# Altium PCB LCM.PcbDoc
Units mm, origin at the board's own origin, x right, y up, seen from the top; angles counter-clockwise.
Board outline 100 x 100 mm, 4 copper layers (1 - TOP, 2 - GND, 3- PWR, 4 - BOT), stack 1.587 mm thick; 134 components, 87 nets, 393 pads, 0 vias.
Unrouted connection lines stored in the file: 250.
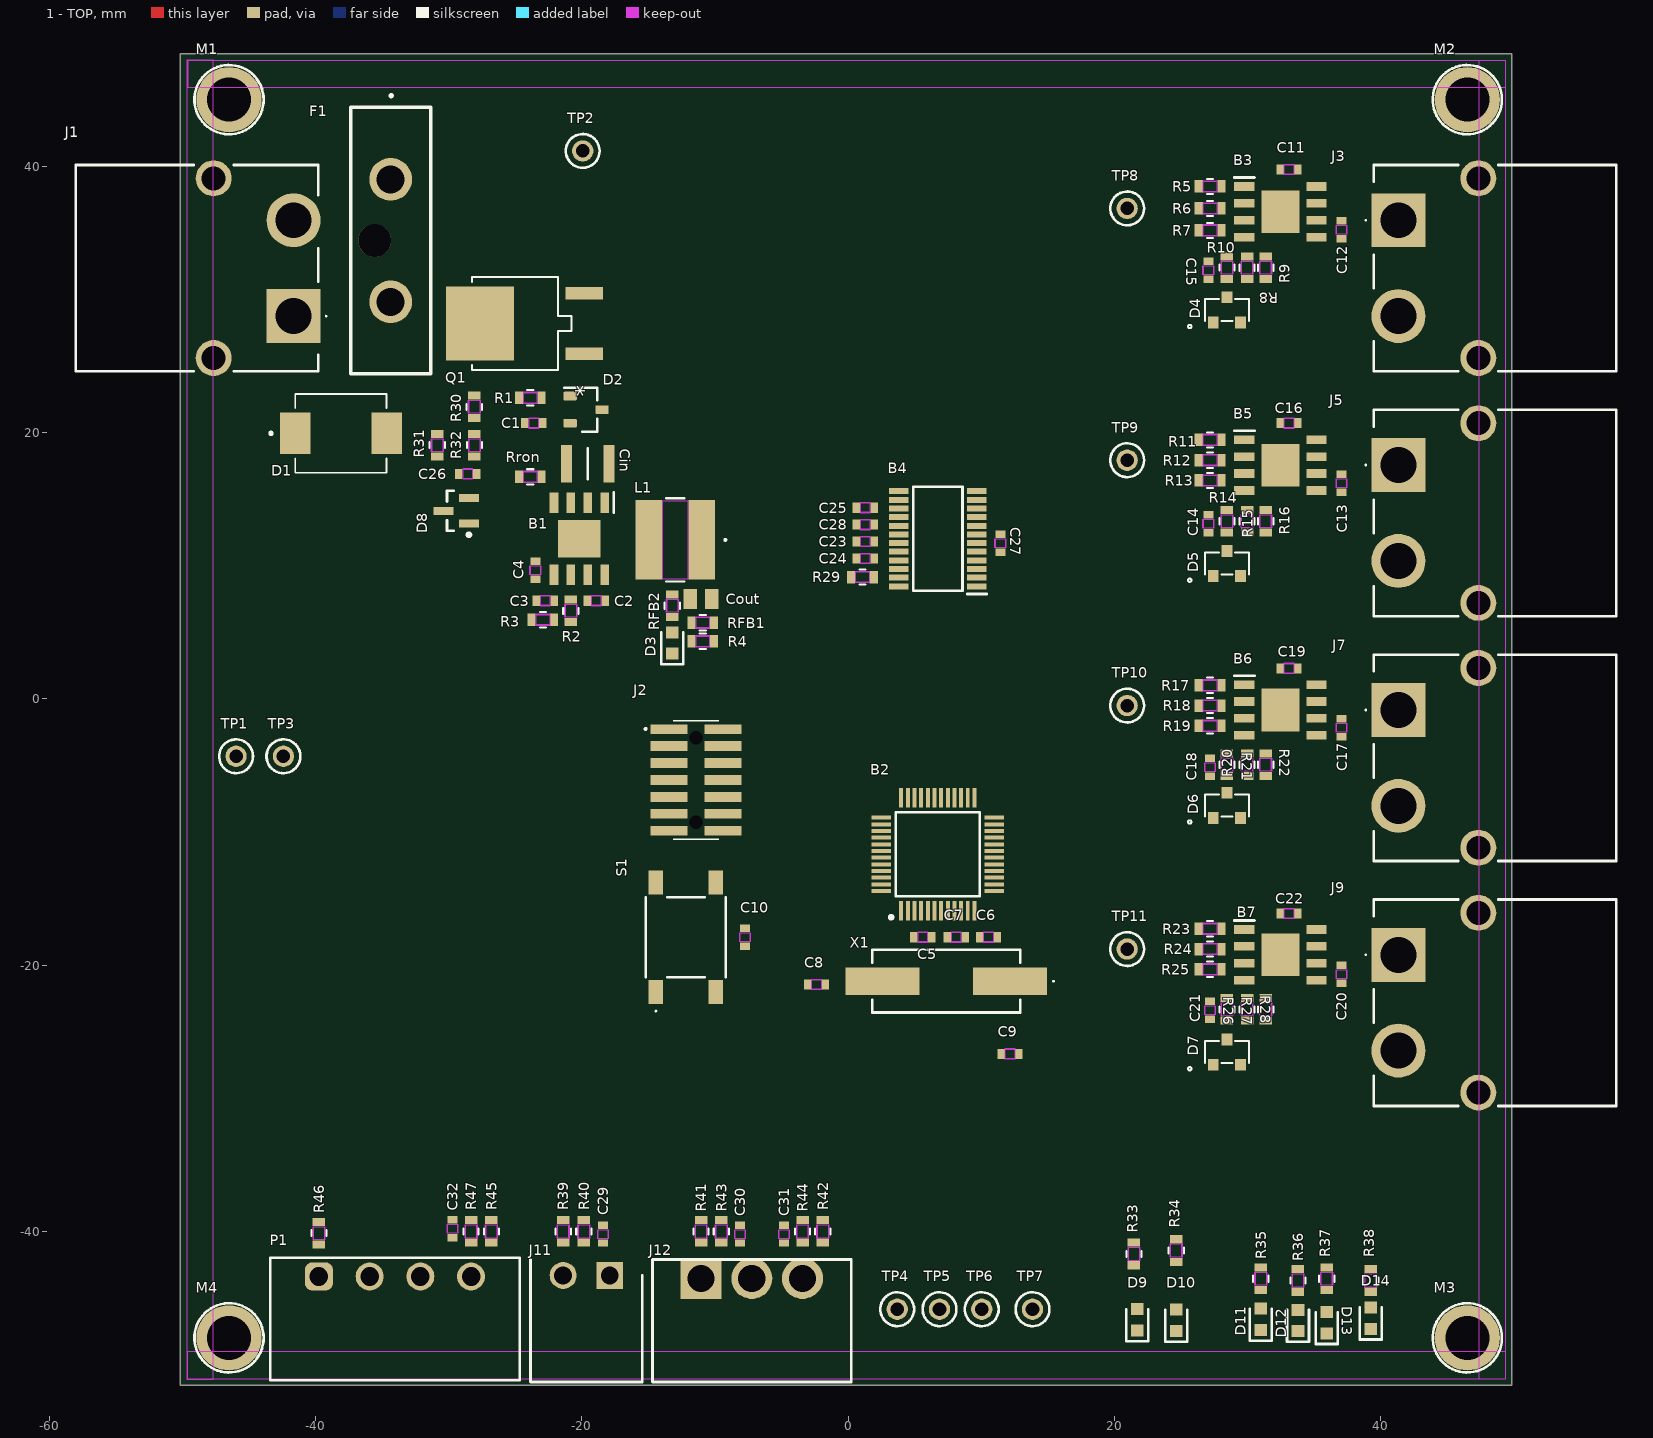
[diagram p0: 1 - TOP view]
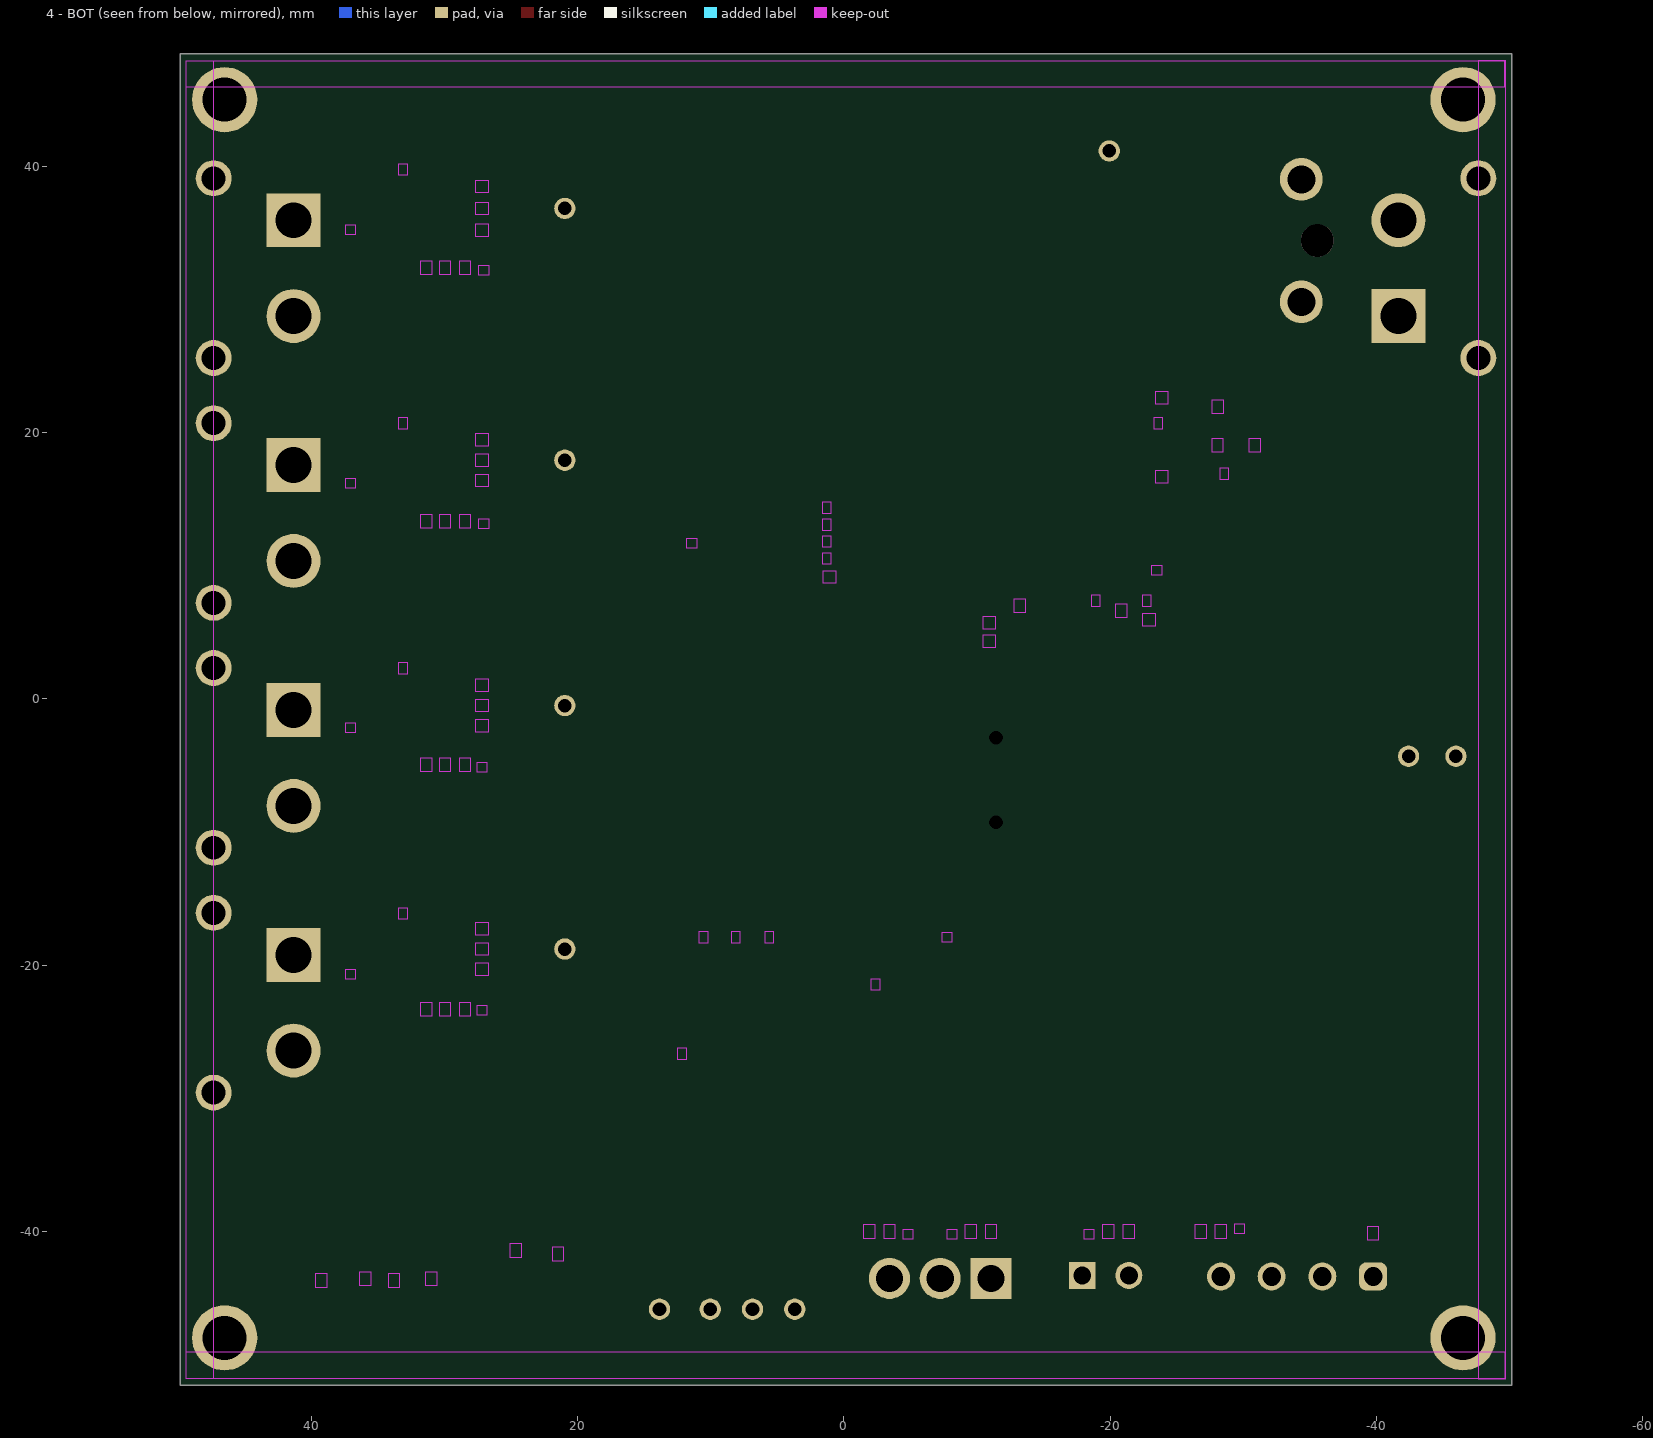
[diagram p1: 4 - BOT view, seen from below]
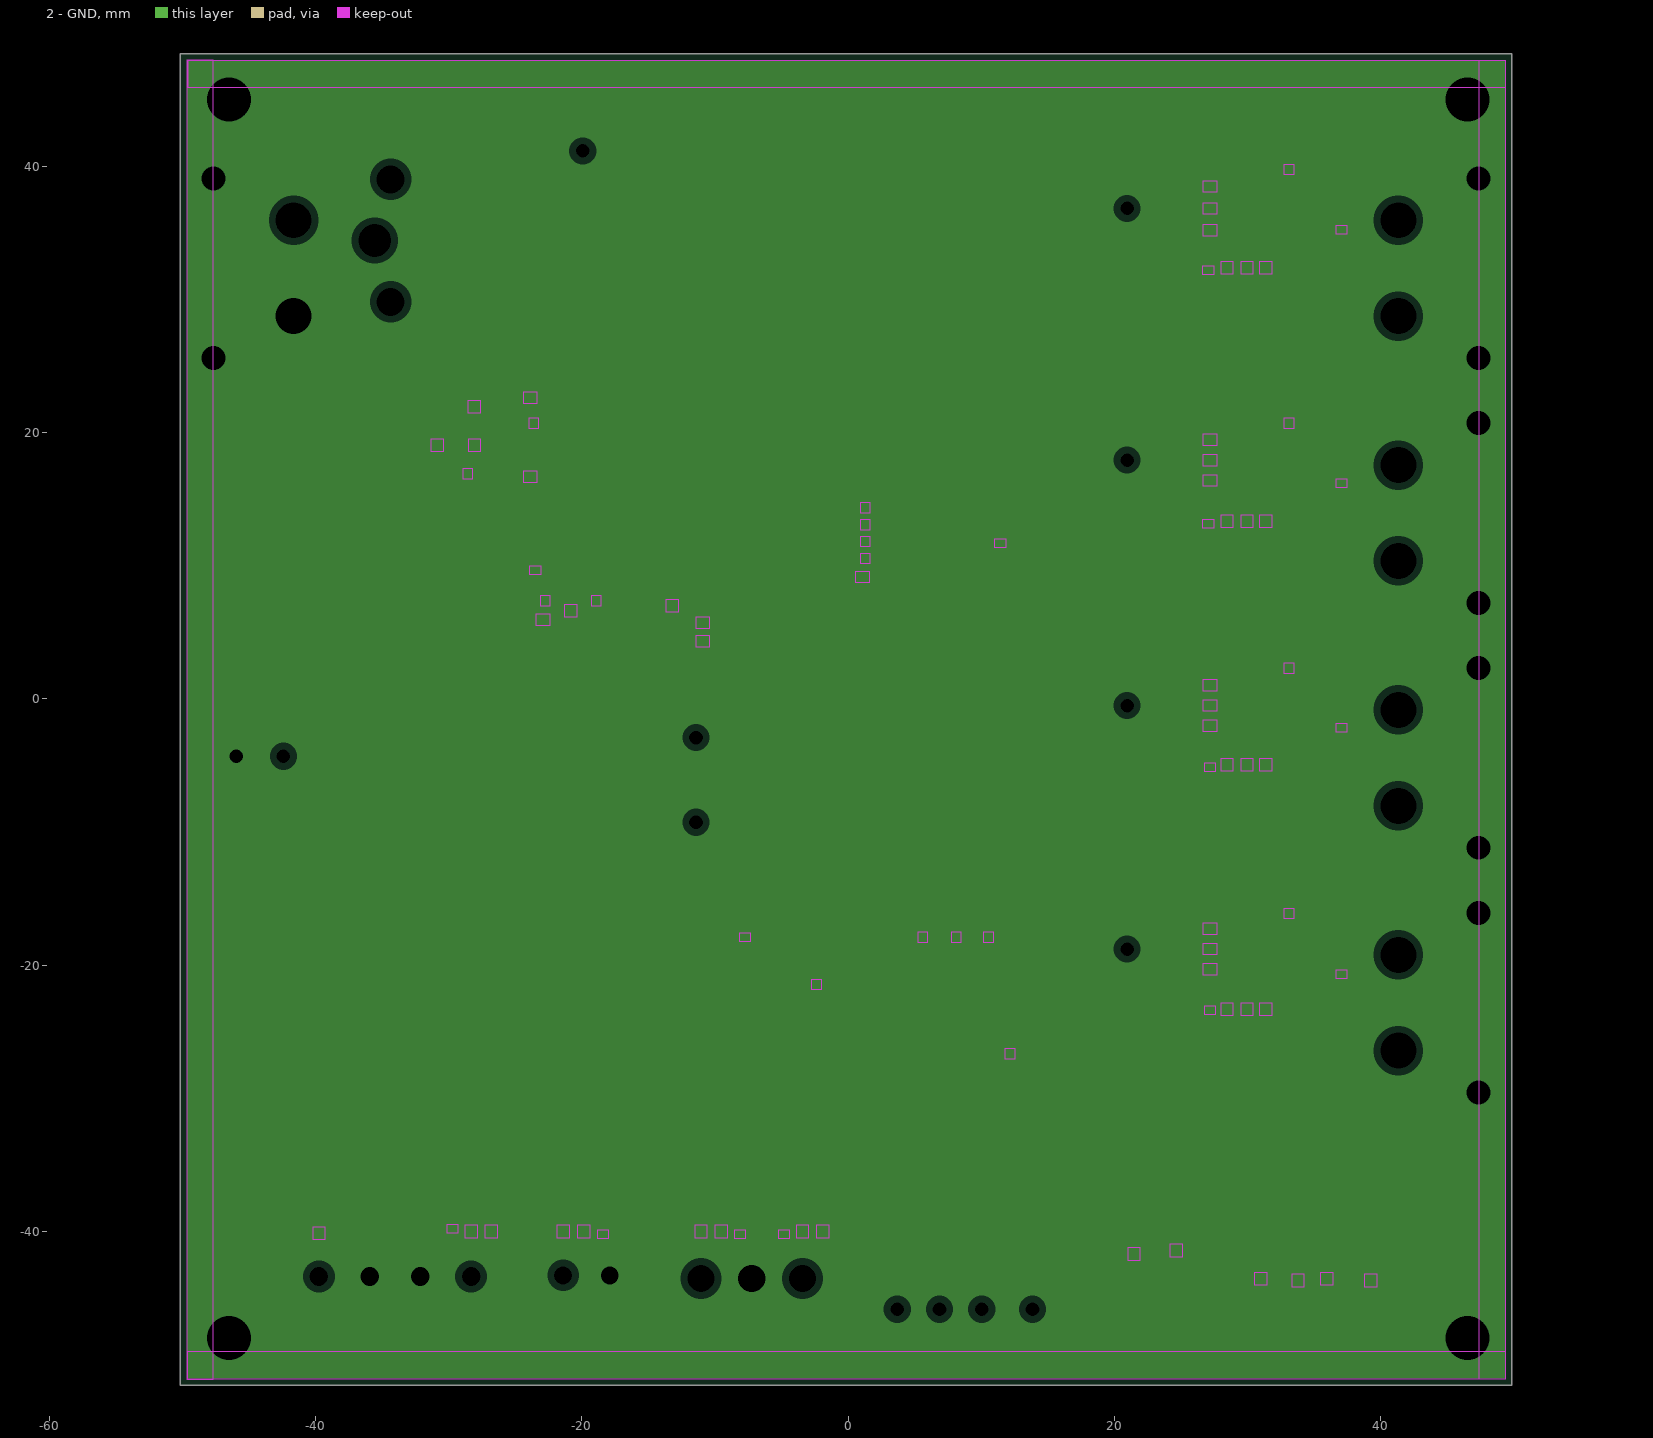
[diagram p2: 2 - GND, clearances drawn from the general rule]
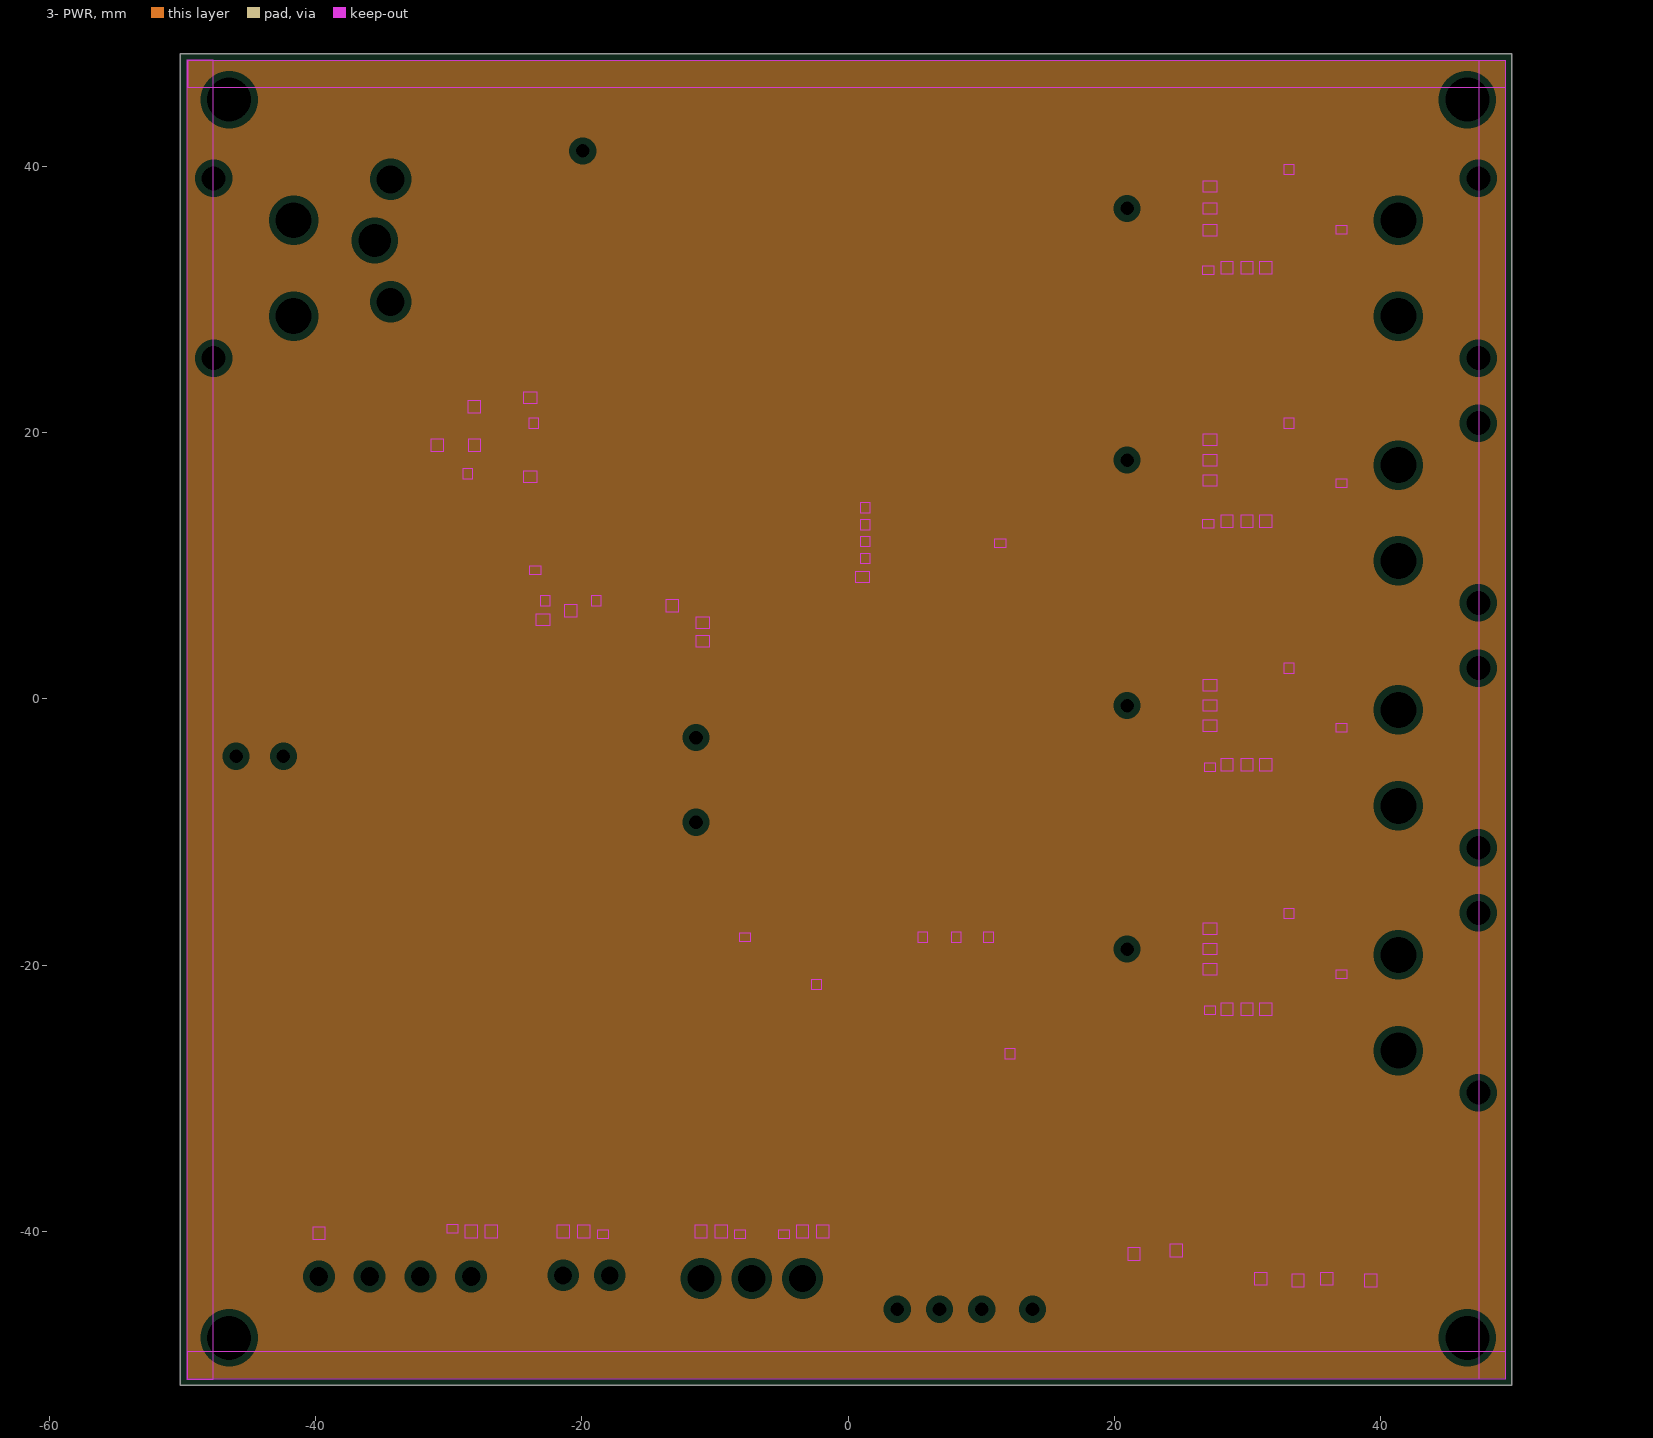
[diagram p3: 3- PWR, clearances drawn from the general rule]

## Layer stack, top to bottom
Top Solder: solder mask 0.0102, Solder Resist, Dk 3.5
1 - TOP: signal copper 0.0356
Dielectric 2: prepreg 0.2104, FR-4, Dk 4.4
2 - GND: plane copper 0.0152, net GND
Dielectric 1: core 1.065, FR-4, Dk 4.6
3- PWR: plane copper 0.0152
Dielectric 3: prepreg 0.2104, FR-4, Dk 4.4
4 - BOT: signal copper 0.0356
Bottom Solder: solder mask 0.0102, Solder Resist, Dk 3.5

## Board outline
-50.165,-51.562 -50.165,48.438 49.835,48.438 49.835,-51.562

## Design rules (kind name [scope] priority, off if disabled: settings)
BoardOutlineClearance BoardOutlineClearance_1 [All] p1: gap=0.3 ignorepadtopadclearanceinfootprint=FALSE
Clearance Clearance_Puissance [InNetClass('Puissance')] p1: gap=0.3 ignorepadtopadclearanceinfootprint=TRUE
Clearance Clearance_2 [All] p2: gap=0.254 ignorepadtopadclearanceinfootprint=FALSE except(0: Hole-Hole; 3: Arc-Hole Track-Hole SMDPad-Hole THPad-Hole Via-Hole Fill-Hole Poly-Hole Region-Hole Text-Hole)
Clearance Clearance_1 [OnMid vs OnMid] p3: gap=0.254 ignorepadtopadclearanceinfootprint=FALSE sourcerule=44 cellrowname=All cellrowtype=0 cellcolname=All cellcoltype=0 innerlayers=TRUE
Clearance Clearance_2 [(ExistsOnLayer('1 - TOP') Or ExistsOnLayer('4 - BOT')) vs (ExistsOnLayer('1 - TOP') Or ExistsOnLayer('4 - BOT'))] p4: gap=0.254 ignorepadtopadclearanceinfootprint=FALSE sourcerule=44 cellrowname=All cellrowtype=0 cellcolname=All cellcoltype=0 outerlayers=TRUE
Clearance [All] p5: gap=0.254 ignorepadtopadclearanceinfootprint=FALSE ismatrix=TRUE
HoleSize [All] p1: absolutevalues=TRUE maxlimit=5.08 minlimit=0.025 maxpercent=80.000 minpercent=20.000
MinimumAnnularRing MinimumAnnularRing_1 [All] p1: minimumring=0.15
PlaneClearance [All] p1: clearance=0.508
PlaneConnect [All] p1: pad.planeconnectstyle=Relief pad.reliefexpansion=0.508 pad.reliefentries=4 pad.reliefconductorwidth=0.254 pad.reliefairgap=0.254 via.planeconnectstyle=Direct via.reliefexpansion=0.508 via.reliefentries=4 via.reliefconductorwidth=0.254 via.reliefairgap=0.254
PolygonConnect [All] p1: thpad.connectstyle=Relief thpad.reliefconductorwidth=0.254 thpad.reliefentries=4 thpad.polygonreliefangle="90 Angle" thpad.airgapwidth=0.254 smdpad.connectstyle=Relief smdpad.reliefconductorwidth=0.254 smdpad.reliefentries=4 smdpad.polygonreliefangle="90 Angle" smdpad.airgapwidth=0.254 via.connectstyle=Direct via.reliefconductorwidth=0.254 via.reliefentries=4 via.polygonreliefangle="90 Angle" via.airgapwidth=0.254
RoutingVias RoutingViaStyle_1 [All] p1: holewidth=0.25 width=0.65 viastyle="Through Hole" minholewidth=0.15 minwidth=0.4 maxholewidth=0.75 maxwidth=2
RoutingVias [All] p2: holewidth=0.711 width=1.27 viastyle="Through Hole" minholewidth=0.711 minwidth=1.27 maxholewidth=0.711 maxwidth=1.27
SolderMaskExpansion [All] p1: expansion=0.05 istentingtop=FALSE useseparateexpansions=TRUE expansionbottom=0.05 istentingbottom=FALSE
Width Width_12V [InNet('12VBat') Or InNet('12V')] p1: maxlimit=25 minlimit=5 preferedwidth=10 minimp=50.000000 maximp=50.000000 favimp=50.000000
Width Width_Puissance [InNetClass('Puissance')] p2: maxlimit=10 minlimit=0.5 preferedwidth=3 minimp=50.000000 maximp=50.000000 favimp=50.000000
Width Width_signaux [All] p3: maxlimit=1 minlimit=0.2 preferedwidth=0.254 minimp=50.000000 maximp=50.000000 favimp=50.000000
Width [All] p4: maxlimit=0.254 minlimit=0.254 preferedwidth=0.254
27 further rules are at their usual default settings.

## Classes and differential pairs
net class Puissance: 12V 12VBat cligno_D cligno_G feux_AR feux_stop_AR

## Components (designator, comment, footprint, x,y, rotation, side; value= is the part's Value field where it differs from the comment)
B1 "LM5163QDDARQ1" BTS5030-1EJA -20.193,12.02 r270 top
B2 "STM32G070CBT6" STM32G070CBT6 6.731,-11.684 r90 top
B3 "BTS5030-1EJA" BTS5030-1EJA 32.467,36.576 r0 top
B4 "AD7124-4BRUZ" AD7124-4BRUZ 6.731,12.02 r180 top
B5 "BTS5030-1EJA" BTS5030-1EJA 32.467,17.551 r0 top
B6 "BTS5030-1EJA" BTS5030-1EJA 32.467,-0.839 r0 top
B7 "BTS5030-1EJA" BTS5030-1EJA 32.467,-19.229 r0 top
C1 "47pF" CAP_0603_WAL-L -23.622,20.701 r0 top
C2 "2.2nF" CAP_0603_WAL-L -18.923,7.366 r0 top
C3 "820pF" CAP_0603_WAL-L -22.759,7.366 r0 top
C4 "39pF" CAP_0603_WAL-L -23.495,9.652 r270 top
C5 "100nF" CAP_0603_WAL-L 5.588,-17.907 r0 top
C6 "4.7µF" CAP_0603_WAL-L 10.541,-17.907 r180 top
C7 "100nF" CAP_0603_WAL-L 8.128,-17.907 r0 top
C8 "20pF" CAP_0603_WAL-L -2.375,-21.463 r180 top
C9 "20pF" CAP_0603_WAL-L 12.154,-26.67 r180 top
C10 "0.1µF" CAP_0603_WAL-L -7.747,-17.907 r90 top
C11 "100nF" CAP_0603_WAL-L 33.109,39.751 r180 top
C12 "4.7n" CAP_0603_WAL-L 37.051,35.217 r90 top
C13 "4.7n" CAP_0603_WAL-L 37.051,16.193 r90 top
C14 "100pF" CAP_0603_WAL-L 27.051,13.137 r90 top
C15 "100pF" CAP_0603_WAL-L 27.051,32.187 r90 top
C16 "100nF" CAP_0603_WAL-L 33.109,20.701 r180 top
C17 "4.7n" CAP_0603_WAL-L 37.051,-2.178 r90 top
C18 "100pF" CAP_0603_WAL-L 27.178,-5.151 r90 top
C19 "100nF" CAP_0603_WAL-L 33.109,2.286 r180 top
C20 "4.7n" CAP_0603_WAL-L 37.051,-20.701 r90 top
C21 "100pF" CAP_0603_WAL-L 27.178,-23.406 r270 top
C22 "100nF" CAP_0603_WAL-L 33.109,-16.129 r180 top
C23 "100nF" CAP_0603_WAL-L 1.27,11.811 r0 top
C24 "100nF" CAP_0603_WAL-L 1.27,10.541 r0 top
C25 "0.1µ" CAP_0603_WAL-L 1.27,14.351 r0 top
C26 "100nF" CAP_0603_WAL-L -28.575,16.891 r180 top
C27 "0.1µ" CAP_0603_WAL-L 11.43,11.684 r90 top
C28 "0.1µ" CAP_0603_WAL-L 1.27,13.081 r0 top
C29 "470nF" CAP_0603_WAL-L -18.415,-40.203 r90 top
C30 "470nF" CAP_0603_WAL-L -8.128,-40.203 r90 top
C31 "470nF" CAP_0603_WAL-L -4.826,-40.203 r90 top
C32 "470nF" CAP_0603_WAL-L -29.718,-39.807 r90 top
Cin "2.2µ" CGA6N3X7R2A225K230AB -19.558,17.653 r180 top
Cout "10µF" KGM21AR71A106KL -11.049,7.493 r0 top
D1 "5.0SMDJ16CA" 5.0SMDJ16CA -38.1,19.939 r0 top
D2 "BZX84C10" "Diode zener 10V" -19.685,21.717 r0 top value=Diode
D3 "LTST-C190KGKT" LEDC1608X80N -13.208,4.191 r90 top
D4 "Diode zener" BZX84B3V3-7-F 28.448,29.21 r0 top value=Diode
D5 "Diode zener" BZX84B3V3-7-F 28.448,10.16 r0 top value=Diode
D6 "Diode zener" BZX84B3V3-7-F 28.448,-8.001 r0 top value=Diode
D7 "Diode zener" BZX84B3V3-7-F 28.448,-26.543 r0 top value=Diode
D8 "BAT54S" BAT54S -29.435,14.122 r180 top
D9 "LTST-C190KAKT" LEDC1608X80N 21.717,-46.65 r90 top
D10 "LTST-C190KAKT" LEDC1608X80N 24.65,-46.68 r90 top
D11 "LTST-C190KRKT" LEDC1608X80N 30.988,-46.609 r90 top
D12 "LTST-C190KRKT" LEDC1608X80N 33.782,-46.698 r90 top
D13 "LTST-C190KRKT" LEDC1608X80N 35.941,-46.863 r90 top
D14 "LTST-C190KRKT" LEDC1608X80N 39.243,-46.523 r90 top
F1 "0287025.PXCN" "Porte Fusible" -35.56,34.417 r270 top
J1 "XT60PW-M" XT60PWM -41.656,28.741 r90 top locked
J2 "FTSH-107-01-L-DV-K-A" FTSH-107-XX-YYY-DV-K-A -11.43,-6.096 r270 top
J3 "Cligno_AR_G" XT60PWM 41.329,35.941 r270 top locked
J5 "cligno_AV_D" XT60PWM 41.329,17.551 r270 top locked
J7 "feux_AR_G" XT60PWM 41.329,-0.839 r270 top
J9 "feux_stop_AR_G" XT60PWM 41.329,-19.229 r270 top locked
J11 "Feux_Arrière" Connecteur_5V_Coude -17.907,-43.313 r180 top locked
J12 "Commande_cligno" Connecteur_3V3_3pos -11.049,-43.538 r180 top locked
L1 "39µH" CDRH5D28NP-390NC -12.987,11.938 r180 top
M1 "Mounting Hole" M3_HOLE -46.5,45 r0 top locked
M2 "Mounting Hole" M3_HOLE 46.5,45 r0 top locked
M3 "Mounting Hole" M3_HOLE 46.5,-48 r0 top locked
M4 "Mounting Hole" M3_HOLE -46.5,-48 r0 top locked
P1 "691305340004" Connecteur_3V3_4pos -34.036,-46.588 r0 top locked
Q1 "SQD90P04-9M4L_GE3" Mosfet_Canal_P -25.019,28.194 r90 top
R1 "10k" "Resistance 0603" -23.876,22.606 r180 top
R2 "10k" "Resistance 0603" -20.828,6.604 r270 top
R3 "500k" "Resistance 0603" -22.927,5.937 r180 top
R4 "1k" "Resistance 0603" -10.922,4.318 r180 top
R5 "150" "Resistance 0603" 27.178,38.481 r180 top
R6 "4.7k" "Resistance 0603" 27.178,36.83 r0 top
R7 "4.7k" "Resistance 0603" 27.178,35.179 r0 top
R8 "4.7k" "Resistance 0603" 29.959,32.372 r90 top
R9 "1.2k" "Resistance 0603" 31.356,32.372 r90 top
R10 "4.7k" "Resistance 0603" 28.448,32.385 r270 top
R11 "150" "Resistance 0603" 27.178,19.444 r180 top
R12 "4.7k" "Resistance 0603" 27.178,17.92 r180 top
R13 "4.7k" "Resistance 0603" 27.178,16.396 r0 top
R14 "4.7k" "Resistance 0603" 28.448,13.335 r270 top
R15 "4.7k" "Resistance 0603" 29.959,13.335 r90 top
R16 "1.2k" "Resistance 0603" 31.356,13.335 r90 top
R17 "150" "Resistance 0603" 27.178,1.016 r180 top
R18 "4.7k" "Resistance 0603" 27.178,-0.508 r180 top
R19 "4.7k" "Resistance 0603" 27.178,-2.032 r0 top
R20 "4.7k" "Resistance 0603" 28.448,-4.953 r270 top
R21 "4.7k" "Resistance 0603" 29.959,-4.953 r90 top
R22 "1.2k" "Resistance 0603" 31.356,-4.953 r90 top
R23 "150" "Resistance 0603" 27.178,-17.272 r180 top
R24 "4.7k" "Resistance 0603" 27.178,-18.796 r0 top
R25 "4.7k" "Resistance 0603" 27.178,-20.32 r0 top
R26 "4.7k" "Resistance 0603" 28.448,-23.327 r270 top
R27 "4.7k" "Resistance 0603" 29.959,-23.327 r90 top
R28 "1.2k" "Resistance 0603" 31.356,-23.327 r270 top
R29 "10k" "Resistance 0603" 1.072,9.144 r0 top
R30 "390k" "Resistance 0603" -28.082,21.924 r270 top
R31 "330" "Resistance 0603" -30.861,19.05 r270 top
R32 "100k" "Resistance 0603" -28.067,19.05 r270 top
R33 "330" "Resistance 0603" 21.463,-41.697 r270 top
R34 "330" "Resistance 0603" 24.638,-41.443 r270 top
R35 "330" "Resistance 0603" 30.988,-43.561 r270 top
R36 "330" "Resistance 0603" 33.782,-43.688 r270 top
R37 "330" "Resistance 0603" 35.941,-43.561 r270 top
R38 "330" "Resistance 0603" 39.243,-43.688 r270 top
R39 "10k" "Resistance 0603" -21.407,-40.005 r270 top
R40 "1k" "Resistance 0603" -19.851,-40.005 r90 top
R41 "10k" "Resistance 0603" -11.049,-40.005 r270 top
R42 "10k" "Resistance 0603" -1.905,-40.005 r270 top
R43 "1k" "Resistance 0603" -9.525,-40.005 r90 top
R44 "1k" "Resistance 0603" -3.429,-40.005 r90 top
R45 "10k" "Resistance 0603" -26.797,-40.005 r270 top
R46 "10k" "Resistance 0603" -39.751,-40.132 r270 top
R47 "1k" "Resistance 0603" -28.321,-40.005 r90 top
RFB1 "680k" "Resistance 0603" -10.922,5.715 r180 top
RFB2 "390k" "Resistance 0603" -13.208,6.985 r90 top
Rron "22k" "Resistance 0603" -23.876,16.669 r180 top
S1 "BP" "Bouton Poussoir" -12.192,-17.907 r90 top
TP1 "Test Point" "Test Point" -45.974,-4.318 r0 top
TP2 "Test Point" "Test Point" -19.939,41.148 r0 top
TP3 "Test Point" "Test Point" -42.418,-4.318 r0 top
TP4 "Test Point" "Test Point" 3.683,-45.847 r0 top
TP5 "Test Point" "Test Point" 6.858,-45.847 r0 top
TP6 "Test Point" "Test Point" 10.033,-45.847 r0 top
TP7 "Test Point" "Test Point" 13.843,-45.847 r0 top
TP8 "Test Point" "Test Point" 20.955,36.83 r180 top
TP9 "Test Point" "Test Point" 20.955,17.92 r0 top
TP10 "Test Point" "Test Point" 20.955,-0.508 r0 top
TP11 "Test Point" "Test Point" 20.955,-18.796 r0 top
X1 "Quartz" XT9M20HRR8M 7.366,-21.209 r180 top

## Footprints (in the part's own frame and the unit in brackets; to place one, negate y for a bottom-side part, rotate by r counter-clockwise, add the part's x,y. Pads: shape width x height; smd on the part's side, far side on the other; paste and mask are expansions set on the pad)
5.0SMDJ16CA [mm]
  rect 2.29x3.12 smd paste+0 mask+0.102: 1(-3.43,0) 2(3.43,0)
  silkscreen extent -5.35,-2.95 3.43,2.95, body extent -3.97,-2.95 3.97,2.95, height 2.62
AD7124-4BRUZ [mm]
  rect 1.475x0.45 smd: 1(-2.938,3.575) 2(-2.938,2.925) 3(-2.938,2.275) 4(-2.938,1.625) 5(-2.938,0.975) 6(-2.938,0.325) 7(-2.938,-0.325) 8(-2.938,-0.975) 9(-2.938,-1.625) 10(-2.938,-2.275) 11(-2.938,-2.925) 12(-2.938,-3.575) 13(2.938,-3.575) 14(2.938,-2.925) 15(2.938,-2.275) 16(2.938,-1.625) 17(2.938,-0.975) 18(2.938,-0.325) 19(2.938,0.325) 20(2.938,0.975) 21(2.938,1.625) 22(2.938,2.275) 23(2.938,2.925) 24(2.938,3.575)
  silkscreen extent -3.67,-3.9 1.85,4.15, body extent -3.2,-3.9 3.2,3.9, height 1.2
BAT54S [mm] "SOT23, 3-Leads, Body 2.9x1.3mm, Pitch 0.95mm, Lead Span 2.5mm, IPC Medium Density"
  rect 1.5x0.6 smd: 1(-0.95,0.95) 2(-0.95,-0.95) 3(0.95,0)
  silkscreen extent -1.07,-1.5 0.7,1.92, body extent -1.24,-1.5 1.23,1.5, height 1.1
"Bouton Poussoir" [mm] "TS406633BK260SMTTR"
  rect 1.8x1.1 smd: 1(-4.1,2.25) 2(4.1,2.25) 3(-4.1,-2.25) 4(4.1,-2.25)
  silkscreen extent -5.6,-3 3,3, body extent -4.5,-3 4.5,3, height 3.3
BTS5030-1EJA [mm]
  rect 1.525x0.65 smd: 1(-2.712,1.905) 2(-2.712,0.635) 3(-2.712,-0.635) 4(-2.712,-1.905) 5(2.712,-1.905) 6(2.712,-0.635) 7(2.712,0.635) 8(2.712,1.905)
  rect 2.85x3.2 smd: 9(0,0)
  silkscreen extent -3.47,2.58 -1.95,2.58, body extent -3,-2.45 3,2.45, height 1.7
BZX84B3V3-7-F [mil]
  rect 32x35 smd paste+0 mask+0: 1(-40.35,-37.2) 2(40.35,-37.2) 3(0,37.2)
  silkscreen extent -115,-54 65,33, body extent -59,-50 59,55, height 39
CAP_0603_WAL-L [mil]
  rect 22x30 smd paste+0 mask+0: 1(-26.5,0) 2(26.5,0)
  1 - TOP keep-out region: -13.5,-14 -13.5,14 13.5,14 13.5,-14
  Keep-Out Layer region: -13.5,-16 -13.5,16 13.5,16 13.5,-16
  body extent -31,-16 31,16, height 32
CDRH5D28NP-390NC [mil] "Inductance, 39µH, 700mA"
  rect 78.63x236 smd paste+0 mask+0: 1(-78.68,0) 2(78.68,0)
  1 - TOP keep-out region: -37.37,-116 -37.37,116 37.37,116 37.37,-116
  silkscreen extent -151,-123 27,123, body extent -118,-118 118,118, height 118
CGA6N3X7R2A225K230AB [mm] "Condensateurs céramique multicouches MLCC - CMS CGA 1210 100V 2.2uF X7R 10% AEC-Q200"
  rect 0.81x2.82 smd: 1(-1.6,0) 2(1.6,0)
  silkscreen extent 0,-1.15 0,1.15, body extent -1.4,-1.22 1.4,1.22, height 2.28
Connecteur_3V3_3pos [mm]
  rect 3.075x3.075 / inner round 3.075 / far side rect 3.075x3.075 hole 2.05: 1(0,0)
  round 3.075 hole 2.05: 2(-3.81,0) 3(-7.62,0)
  silkscreen extent -11.27,-1.43 3.65,7.78, body extent -11.27,-1.43 3.65,7.78, height 7.28
Connecteur_3V3_4pos [mm] "Horizontal PCB Header with Plastic Latch, pitch 3.81mm, 04p"
  rrect50% 2.1x2.1 hole 1.4: 1(-5.715,3.2)
  round 2.1 hole 1.4: 2(-1.905,3.2) 3(1.905,3.2) 4(5.715,3.2)
  silkscreen extent -9.37,-4.6 9.37,4.6, body extent -9.37,-4.6 9.37,4.6, height 7.25
Connecteur_5V_Coude [mm]
  rect 2.025x2.025 hole 1.35: 1(0,0)
  round 2.025 hole 1.35: 2(3.5,0)
  silkscreen extent -2.45,-1.2 5.95,8, body extent -2.45,-1.2 5.95,8, height 7.25
"Diode zener 10V" [mm] "SOT23, 3-Leads, IPC Medium Density, TO-236"
  rrect25% 1x0.65 smd: 1(-1.2,1.02) 2(-1.2,-1.02) 3(1.2,0)
  silkscreen extent -1.65,-1.65 0.85,1.65, body extent -1.3,-1.52 1.3,1.52, height 1.3
FTSH-107-XX-YYY-DV-K-A [mm]
  rect 0.74x2.79 smd: 1(-3.81,-2.035) 2(-3.81,2.035) 3(-2.54,-2.035) 4(-2.54,2.035) 5(-1.27,-2.035) 6(-1.27,2.035) 7(0,-2.035) 8(0,2.035) 9(1.27,-2.035) 10(1.27,2.035) 11(2.54,-2.035) 12(2.54,2.035) 13(3.81,-2.035) 14(3.81,2.035)
  round 0.51 hole 1.02 unplated: 15(-3.175,0) 16(3.175,0)
  silkscreen extent -4.44,-3.83 4.44,1.72, body extent -4.44,-3.15 4.45,2.69, height 5.97
KGM21AR71A106KL [mm] "Capa 10µF, 10VDC, X7R,"
  rect 1.02x1.47 smd: 1(-0.81,0) 2(0.81,0)
  body extent -1,-0.63 1,0.63, height 1.45
LEDC1608X80N [mm] "LTST-C190KGKT"
  rect 0.9x0.95 smd: 1(-0.8,0) 2(0.8,0)
  silkscreen extent -1.6,-0.82 0.8,0.82, body extent -0.8,-0.4 0.8,0.4, height 0.52
M3_HOLE [mm]
  round 4.9 hole 3.3: 1(0,0)
  silkscreen extent -2.6,-2.6 2.6,2.6
Mosfet_Canal_P [mil]
  rect 37x110 smd paste+0 mask+0: 1(-89.76,-204.5) 3(89.76,-204.5)
  rect 219x201 smd paste+0 mask+0: 4(0,103)
  silkscreen extent -138,-168 138,128, body extent -133,-238 133,173, height 94
"Porte Fusible" [mm]
  round 3.2 hole 2.1: 1(-4.6,1.2) 2(4.6,1.2)
  round 2.45 hole 2.45 unplated: 3(0,0)
  silkscreen extent -10.95,-1.8 10,4.2, body extent -9.9,-2.69 10.25,3.31, height 17.5
"Resistance 0603" [mm]
  rect 0.605x0.939 smd paste+0 mask+0: 1(-0.848,0) 2(0.848,0)
  1 - TOP keep-out region: -0.495,-0.394 -0.495,0.394 0.495,0.394 0.495,-0.394
  Keep-Out Layer region: -0.495,-0.445 -0.495,0.444 0.495,0.445 0.495,-0.444
  silkscreen extent -0.23,-0.57 0.23,0.57, body extent -0.85,-0.44 0.85,0.44, height 0.56
STM32G070CBT6 [mm]
  rect 1.475x0.3 smd: 1(-4.238,2.75) 2(-4.238,2.25) 3(-4.238,1.75) 4(-4.238,1.25) 5(-4.238,0.75) 6(-4.238,0.25) 7(-4.238,-0.25) 8(-4.238,-0.75) 9(-4.238,-1.25) 10(-4.238,-1.75) 11(-4.238,-2.25) 12(-4.238,-2.75) 25(4.238,-2.75) 26(4.238,-2.25) 27(4.238,-1.75) 28(4.238,-1.25) 29(4.238,-0.75) 30(4.238,-0.25) 31(4.238,0.25) 32(4.238,0.75) 33(4.238,1.25) 34(4.238,1.75) 35(4.238,2.25) 36(4.238,2.75)
  rect 0.3x1.475 smd: 13(-2.75,-4.238) 14(-2.25,-4.238) 15(-1.75,-4.238) 16(-1.25,-4.238) 17(-0.75,-4.238) 18(-0.25,-4.238) 19(0.25,-4.238) 20(0.75,-4.238) 21(1.25,-4.238) 22(1.75,-4.238) 23(2.25,-4.238) 24(2.75,-4.238) 37(2.75,4.238) 38(2.25,4.238) 39(1.75,4.238) 40(1.25,4.238) 41(0.75,4.238) 42(0.25,4.238) 43(-0.25,4.238) 44(-0.75,4.238) 45(-1.25,4.238) 46(-1.75,4.238) 47(-2.25,4.238) 48(-2.75,4.238)
  silkscreen extent -4.85,-3.15 3.15,3.62, body extent -4.5,-4.5 4.5,4.5, height 1.6
"Test Point" [mm] "Keystone Electronics 5001"
  round 1.6 hole 1.02: 1(0,0)
  silkscreen extent -1.27,-1.27 1.27,1.27, body extent -1.26,-1.27 1.26,1.27, height 4.94
XT9M20HRR8M [mm] "Qartz Crystal 8MHz"
  rect 5.55x2.05 smd: 1(-4.775,0) 2(4.775,0)
  silkscreen extent -8.1,-2.35 5.55,2.35, body extent -7.34,-2.35 7.34,2.35, height 4.6
XT60PWM [mm]
  rect 4.05x4.05 hole 2.7: 1(0,0)
  round 4.05 hole 2.7: 2(7.2,0)
  round 2.7 hole 1.8: 3(-3.15,6) 4(10.35,6)
  silkscreen extent -4.15,-2.5 11.35,16.35, body extent -4.35,-1.82 11.55,16.38, height 8.61

## Part data
B1: "100-V input, 0.5-A synchronous buck DC/DC converter with ultra-low IQ", Manufacturer_Name="Texas Instruments", Mouser Part Number=595-LM5163QDDARQ1, Datasheet Link=http://www.ti.com/lit/gpn/LM5163-Q1, Geometry.Height=1.7mm, Manufacturer_Part_Number=LM5163QDDARQ1, Mouser Price/Stock=https://www.mouser.co.uk/ProductDetail/Texas-Instruments/LM5163QDDARQ1?qs=mAH9sUMRCtv%252Bp97Xz%2FAX6Q%3D%3D
B2: "ARM Microcontrollers - MCU Arm Cortex -M0+ 32-bit MCU, 128 KB Flash, 36 KB RAM, 4x USART, timers, ADC, comm. I/Fs, 2.0-3.6V", Manufacturer_Name=STMicroelectronics, Mouser Part Number=511-STM32G070CBT6, Datasheet Link=https://www.st.com/resource/en/datasheet/stm32g070cb.pdf, Geometry.Height=1.6mm, Manufacturer_Part_Number=STM32G070CBT6, Mouser Price/Stock=https://www.mouser.co.uk/ProductDetail/STMicroelectronics/STM32G070CBT6?qs=l7cgNqFNU1gFKn1as7Ms0g%3D%3D
B3 B5 B6 B7: "Power Switch ICs - Power Distribution Profet Smart High Side Switch 28V 36A", Manufacturer_Name=Infineon, Mouser Part Number=726-BTS5030-1EJA, Datasheet Link=https://ms.componentsearchengine.com/Datasheets/1/BTS5030-1EJA.pdf, Geometry.Height=1.7mm, Manufacturer_Part_Number=BTS5030-1EJA, Mouser Price/Stock=https://www.mouser.co.uk/ProductDetail/Infineon-Technologies/BTS5030-1EJA?qs=%252BWnEOWq1JvHis1YUcAvI1A%3D%3D
B4: "4-Channel, Low Noise, Low Power, 24-Bit, Sigma-Delta ADC with PGA and Reference", Manufacturer_Name="Analog Devices", Mouser Part Number=584-AD7124-4BRUZ, Datasheet Link=http://www.analog.com/media/en/technical-documentation/data-sheets/AD7124-4.pdf, Geometry.Height=1.2mm, Manufacturer_Part_Number=AD7124-4BRUZ, Mouser Price/Stock=https://www.mouser.co.uk/ProductDetail/Analog-Devices/AD7124-4BRUZ?qs=8Sj0zgMuDMVqCrsELALuFg%3D%3D
C1 C5 C6 C7 C8 C9 C10 C11 C12 C13 C14 C15 C16 C17 C18 C19 C20 C21 C22 C23 C24 C25 C26 C27 C28 C29 C30 C31 C32: library part Capa, "No Description Available", Manufacturer_Name=Walsin, Manufacturer_Part_Number=0603N200J500CT, Copyright="Copyright (C) 2026 Ultra Librarian. All rights reserved."
C2: library part Capa, "GCM188R71H222KA37D", Manufacturer_Name=Walsin, Manufacturer_Part_Number=0603N200J500CT, Copyright="Copyright (C) 2026 Ultra Librarian. All rights reserved."
C3: library part Capa, "CGA3E2C0G1H821J080AA", Manufacturer_Name=Walsin, Manufacturer_Part_Number=0603N200J500CT, Copyright="Copyright (C) 2026 Ultra Librarian. All rights reserved."
C4: library part Capa, "C0603C390J5GACTU", Manufacturer_Name=Walsin, Manufacturer_Part_Number=0603N200J500CT, Copyright="Copyright (C) 2026 Ultra Librarian. All rights reserved."
Cin: library part Capa, "CGA6N3X7R2A225K230AB", Manufacturer_Name=Walsin, Manufacturer_Part_Number=0603N200J500CT, Copyright="Copyright (C) 2026 Ultra Librarian. All rights reserved."
Cout: library part Capa, "KGM21AR71A106KL", Manufacturer_Name=Walsin, Manufacturer_Part_Number=0603N200J500CT, Copyright="Copyright (C) 2026 Ultra Librarian. All rights reserved."
D1: "26V Clamp 193A Ipp Tvs Diode Surface Mount DO-214AB (SMCJ)", Package="DO-214 Littelfuse Inc.", Check_prices=https://www.snapeda.com/parts/5.0SMDJ16CA/Littelfuse/view-part/?ref=eda, MF=Littelfuse, MP=5.0SMDJ16CA, SnapEDA_Link=https://www.snapeda.com/parts/5.0SMDJ16CA/Littelfuse/view-part/?ref=snap
D2: "Diode zener 10V", Datasheet=https://diotec.com/de/produktliste/D.html, ki_description="Diode with NC pin", ki_keywords="Doide NC pin", Reference=D
D3: library part LED, "Lite-On LTST-C190KGKT, 571 nm Green LED, 1608 (0603) SMD package", Manufacturer_Name=Lite-On, Mouser Part Number=859-LTST-C190KGKT, Geometry.Height=0.8mm, Manufacturer_Part_Number=LTST-C190KGKT, Mouser Price/Stock=https://www.mouser.co.uk/ProductDetail/Lite-On/LTST-C190KGKT?qs=205qCy6M2Q%252BAdcgwUZktqw%3D%3D
D8: library part "Diode Shottky double BAT54S", "DIODE SCHOTTKY DOUBLE", Manufacturer=ZETEX, Supplier Part Number=9526510, ComponentLink1Description=http://www.farnell.com/datasheets/27632.pdf, ComponentLink1URL=http://www.farnell.com/datasheets/27632.pdf, Manufacturer Part Number=BAT54S, Pricing="5=0,32, 25=0,26, 100=0,21, 1000=0,17 (EUR)", RoHS=YES, Supplier=Farnell
D9 D10: library part LED, "Lite-On LTST-C190KAKT, 571 nm Orange LED, 1608 (0603) SMD package", Manufacturer_Name=Lite-On, Manufacturer_Part_Number=LTST-C190KGKT, Mouser Part Number=859-LTST-C190KGKT, Geometry.Height=0.8mm, Mouser Price/Stock=https://www.mouser.co.uk/ProductDetail/Lite-On/LTST-C190KGKT?qs=205qCy6M2Q%252BAdcgwUZktqw%3D%3D
D11 D12 D13 D14: library part LED, "Lite-On LTST-C190KRKT 571 nm RED LED, 1608 (0603) SMD package", Manufacturer_Name=Lite-On, Manufacturer_Part_Number=LTST-C190KGKT, Mouser Part Number=859-LTST-C190KGKT, Geometry.Height=0.8mm, Mouser Price/Stock=https://www.mouser.co.uk/ProductDetail/Lite-On/LTST-C190KGKT?qs=205qCy6M2Q%252BAdcgwUZktqw%3D%3D
F1: library part Fuse, "Clear ATOF F Fuse 25A 32V", Manufacturer_Name=LITTELFUSE, Mouser Part Number=576-0287025.PXCN, Datasheet Link=https://www.littelfuse.com/~/media/automotive/datasheets/fuses/passenger-car-and-commercial-vehicle/blade-fuses/littelfuse_atof_datasheet.pdf, Geometry.Height=12.3mm, Manufacturer_Part_Number=0287025.PXCN, Mouser Price/Stock=https://www.mouser.co.uk/ProductDetail/Littelfuse/0287025.PXCN?qs=Vv6sT79n3zTQ3ExP8aVIIA%3D%3D
J1: "Connector", Manufacturer_Name=Amass, Datasheet Link=https://www.tme.eu/Document/b13629717d44ae038681dba08d18c0b6/XT60PW-M.pdf, Height=8.4mm, Manufacturer_Part_Number=XT60PW-M
J2: "Connecteur de programmation", Manufacturer_Name=SAMTEC, Mouser Part Number=200-FTSH10701LDVKA, Arrow Part Number=FTSH-107-01-L-DV-K-A, Arrow Price/Stock=https://www.arrow.com/en/products/ftsh-107-01-l-dv-k-a/samtec.html?utm_currency=USD&region=nac, Datasheet Link=http://suddendocs.samtec.com/prints/ftsh-1xx-xx-xxx-dv-xxx-xxx-mkt.pdf, Manufacturer_Part_Number=FTSH-107-01-L-DV-K-A, Mouser Price/Stock=https://www.mouser.co.uk/ProductDetail/Samtec/FTSH-107-01-L-DV-K-A?qs=PB6%2FjmICvI3xEHFou4PhNg%3D%3D
J3 J5 J7 J9: library part XT60PW-M, "Connector", Manufacturer_Name=Amass, Datasheet Link=https://www.tme.eu/Document/b13629717d44ae038681dba08d18c0b6/XT60PW-M.pdf, Height=8.4mm, Manufacturer_Part_Number=XT60PW-M
J11: library part Connecteur_5V
J12: library part Connecteur_3V3_3_pos, "WR-TBL Terminal block - PCB Header - THT Serie 3053 - 3,81mm pitch - Monoblock THT - Green - Horizontal PCB Header with Plastic ears 03p", Manufacturer_Name="Wurth Elektronik", Manufacturer_Part_Number=691305340003, Mouser Part Number=710-691305340003, Datasheet Link=https://www.digikey.com/en/products/detail/w%C3%BCrth-elektronik/691305340003/6644174, Geometry.Height=7.5mm, Mouser Price/Stock=https://www.mouser.co.uk/ProductDetail/Wurth-Elektronik/691305340003?qs=lBTPRtX1sU90CHy4WHMybg%3D%3D
L1: library part Inductance, "Description", Manufacturer_Name=Sumida, Manufacturer_Part_Number=CDRH5D28NP-100NC, Copyright="Copyright (C) 2025 Ultra Librarian. All rights reserved."
P1: library part Connecteur_3V3_4pos, "WR-TBL Series 3053 Horizontal PCB Header, THT, pitch 3.81mm, 04p", Manufacturer="Wurth Elektronik", Operating Temperature Max=105degC, Operating Temperature Min=-40degC, Rated Current=12A, Working Voltage="300V (AC)", Application=Pluggable, ComponentLink1Description="Website Link", ComponentLink1URL=https://www.we-online.com, ComponentLink2Description="Datasheet Link", ComponentLink2URL=https://www.we-online.com/components/products/datasheet/691305340004, Lead Pitch=3.81mm, Manufacturer Part Number=691305340004, Modularity=No, Mount="Through Hole", Number of Pins=4, Number of Rows=1, Orientation=Horizontal, Packaging=Box, Product Series=WR-TBL
Q1: library part "Mosfet Canal P", "P-CHANNEL 40-V (D-S) 175C MOSFET", Manufacturer_Name=Vishay, Copyright="Copyright (C) 2026 Ultra Librarian. All rights reserved.", Datasheet=https://www.vishay.com/doc?66743, Manufacturer_Part_Number=SQD90P04-9M4L_GE3, Type=Transistors
R1 R2 R4 R5 R9 R11 R16 R17 R22 R23 R28 R29 R33 R34 R35 R36 R37 R38: library part Résistance, "CPF 0603 100K 0.1% 25PPM 5K RL", Manufacturer_Name="TE Connectivity", Manufacturer_Part_Number=CPF0603B100KE, Copyright="Copyright (C) 2026 Ultra Librarian. All rights reserved."
R3 R6 R7 R8 R10 R12 R13 R14 R15 R18 R19 R20 R21 R24 R25 R26 R27 R30 R31 R32 R39 R40 R41 R42 R43 R44 R45 R46 R47 RFB1 RFB2 Rron: library part Résistance, Manufacturer_Name="TE Connectivity", Manufacturer_Part_Number=CPF0603B100KE, Copyright="Copyright (C) 2026 Ultra Librarian. All rights reserved."
S1: "Switch (4-Pin Push)", Manufacturer_Name="Same Sky", Manufacturer_Part_Number=TS40-66-33-BK-260-SMT-TR, Datasheet Link=https://www.sameskydevices.com/product/resource/ts40.pdf, Height=3.4mm
TP1 TP2 TP3 TP4 TP5 TP6 TP7 TP8 TP9 TP10 TP11: "Test Point Keystone Electronics 5001", Arrow Part Number=5001, Manufacturer_Name="Keystone Electronics", Mouser Part Number=534-5001, Arrow Price/Stock=https://www.arrow.com/en/products/5001/keystone-electronics.html?utm_currency=USD&region=europe, Datasheet Link=http://www.keyelco.com/product-pdf.cfm?p=1310, Manufacturer_Part_Number=5001, Mouser Price/Stock=https://www.mouser.co.uk/ProductDetail/Keystone-Electronics/5001?qs=q0tsjPZWdm%2FW0vdr%2FwowKg%3D%3D
X1: "Low Profile SMD Type Crystal Units", Manufacturer_Name=Vishay, Manufacturer_Part_Number=XT9M20HRR8M, Mouser Part Number=70-XT49MR-208MHZTR, Datasheet Link=https://www.vishay.com/docs/35012/xt49m.pdf, Geometry.Height=4.5mm, Mouser Price/Stock=https://www.mouser.co.uk/ProductDetail/Vishay-Dale/XT9M20HRR8M?qs=n2tc7qt3lsa%252BUGKkvhaCdg%3D%3D
D4 D5 D6 D7: Datasheet=https://diotec.com/de/produktliste/D.html, ki_description="Diode with NC pin", ki_keywords="Doide NC pin", Reference=D

## Nets (pads, with @x,y where several pads share a name; then routed paths per layer and width w, separated by ;. In a path a pad name is that pad's centre, name@x,y a point inside that pad or via, vN(x,y) a via of type N, cw(c..) or ccw(c..) an arc to the next point about the centre after c; other vN are vias at no path point)
12V: F1.1 J1.2
12VBat: B1.2 B1.3 B3.9 B5.9 B6.9 B7.9 C1.2 C11.2 C16.2 C19.2 C22.2 Cin.2 D2.3 Q1.3 R30.1 TP2.1
+3V3: B2.4 B2.6 B4.6 B4.22 C3.2 C5.1 C6.2 C7.2 C23.2 C24.2 Cout.2 D8.2 J2.3 L1.1 R2.1 R4.1 R29.1 R39.1 R41.1 R42.1 R45.1 R46.1 RFB1.1 TP3.1
ADC_D_cligno: B4.9 C14.2 R14.1
ADC_feux_AR: B4.10 C18.2 R20.1
ADC_feux_stop_AR: B4.11 C21.2 R26.1
ADC_G_cligno: B4.8 C15.2 R10.1
BT_cligno_D: B2.26 C30.2 R43.2
BT_Cligno_G: B2.27 C31.2 R44.2
BT_Feux_AR: B2.29 C29.2 R40.2
BT_Warning: B2.28 C32.2 R47.2
cligno_D: B5.6 B5.7 B5.8 C13.2 J5.1 J5.2
cligno_G: B3.6 B3.7 B3.8 C12.2 J3.1 J3.2
Defauts_Feux_Stop: B2.24 R38.1
DEN_D_cligno: B2.31 R13.1
DEN_feux_AR: B2.39 R19.1
DEN_feux_stop_AR: B2.40 R25.1
DEN_G_cligno: B2.30 R7.1
Défauts_cligno_D: B2.22 R36.1
Défauts_cligno_G: B2.21 R35.1
Défauts_Feux_Arr: B2.23 R37.1
EN_feux_AR: B2.38 R18.1 TP10.1
EN_feux_stop_AR: R24.1 TP11.1
feux_AR: B6.6 B6.7 B6.8 C17.2 J7.1 J7.2
feux_stop_AR: B7.6 B7.7 B7.8 C20.2 J9.1 J9.2
GND: B1.1 B1.9 B2.5 B2.7 B4.7 B4.17 B4.19 C1.1 C5.2 C6.1 C7.1 C8.2 C9.2 C10.1 C11.1 C12.1 C13.1 C14.1 C15.1 C16.1 C17.1 C18.1 C19.1 C20.1 C21.1 C22.1 C23.1 C24.1 C25.1 C26.1 C27.2 C28.1 C29.1 C30.1 C31.1 C32.1 Cin.1 Cout.1 D1.1 D3.1 D4.1 D5.1 D6.1 D7.1 D8.1 D9.1 D10.1 D11.1 D12.1 D13.1 D14.1 J1.1 J1.3 J1.4 J2.5 J2.7 J2.11 J3.3 J3.4 J5.3 J5.4 J7.3 J7.4 J9.3 J9.4 J11.1 J12.2 M1.1 M2.1 M3.1 M4.1 P1.2 P1.3 R1.2 R5.2 R9.1 R11.2 R16.1 R17.2 R22.1 R23.2 R28.1 R32.2 RFB2.2 Rron.2 S1.1 S1.2 TP1.1
Mesure_12VBat: B4.14 C26.2 D8.3 R31.2
NetB1_4: B1.4 Rron.1
NetB1_5: B1.5 C4.1 RFB1.2 RFB2.1
NetB1_7: B1.7 C2.1
NetB1_8: B1.8 C2.2 L1.2 R3.1
NetB3_1: B3.1 R5.1
NetB3_2: B3.2 R6.2
NetB3_3: B3.3 R7.2
NetB3_4: B3.4 R8.2 R9.2
NetB4_5: B4.5 C27.1
NetB4_18: B4.18 C25.2
NetB4_20: B4.20 C28.2
NetB5_1: B5.1 R11.1
NetB5_2: B5.2 R12.2
NetB5_3: B5.3 R13.2
NetB5_4: B5.4 R15.2 R16.2
NetB6_1: B6.1 R17.1
NetB6_2: B6.2 R18.2
NetB6_3: B6.3 R19.2
NetB6_4: B6.4 R21.2 R22.2
NetB7_1: B7.1 R23.1
NetB7_2: B7.2 R24.2
NetB7_3: B7.3 R25.2
NetB7_4: B7.4 R27.2 R28.2
NetC3_1: C3.1 C4.2 R3.2
NetD1_2: D1.2 F1.2 Q1.4
NetD2_1: D2.1 Q1.1 R1.1
NetD3_2: D3.2 R4.2
NetD4_3: D4.3 R8.1 R10.2
NetD5_3: D5.3 R14.2 R15.1
NetD6_3: D6.3 R20.2 R21.1
NetD7_3: D7.3 R26.2 R27.1
NetD9_2: D9.2 R33.2
NetD10_2: D10.2 R34.2
NetD11_2: D11.2 R35.2
NetD12_2: D12.2 R36.2
NetD13_2: D13.2 R37.2
NetD14_2: D14.2 R38.2
NetJ11_2: J11.2 R39.2 R40.1
NetJ12_1: J12.1 R41.2 R43.1
NetJ12_3: J12.3 R42.2 R44.1
NetP1_1: P1.1 R46.2
NetP1_4: P1.4 R45.2 R47.1
NetR30_2: R30.2 R31.1 R32.1
NRST: B2.10 C10.2 J2.12 S1.3 S1.4
OSC_IN: B2.8 C8.1 X1.2
OSC_OUT: B2.9 C9.1 X1.1
PB9: B1.6 B2.48 R2.2
PWM_D_cligno: B2.25 R12.1 TP9.1
PWM_G_cligno: B2.14 R6.1 TP8.1
SPI1_CS: B2.15 B4.4 TP7.1
SPI1_MISO: B2.17 B4.24 TP6.1
SPI1_MOSI: B2.13 B4.1 TP5.1
SPI1_SCK: B2.12 B4.2 TP4.1
ST_LINK_Rx: B2.46 J2.13
ST_LINK_Tx: B2.45 J2.14
SWCLK: B2.36 J2.6
SWDIO: B2.35 J2.4
SYNC_ADC: B2.41 B4.23 R29.2
Temoin_cligno_D: B2.20 R34.1
Temoin_cligno_G: B2.19 R33.1
pads on no net: B2.1 B2.2 B2.3 B2.11 B2.16 B2.18 B2.32 B2.33 B2.34 B2.37 B2.42 B2.43 B2.44 B2.47 B3.5 B4.3 B4.12 B4.13 B4.15 B4.16 B4.21 B5.5 B6.5 B7.5 D2.2 D4.2 D5.2 D6.2 D7.2 F1.3 J2.1 J2.2 J2.8 J2.9 J2.10 J2.15 J2.16

## Polygon pours and split planes (outlines as drawn)
GND on 2 - GND (split plane): 49.325,-51.052 -49.655,-51.052 -49.655,47.928 49.325,47.928
no net on 3- PWR (split plane): 49.325,-51.052 -49.655,-51.052 -49.655,47.928 49.325,47.928

## Keep-outs
Keep-Out Layer:
  rectangle: 47.371,-51.054 49.371,47.928
  rectangle: -49.59,45.928 49.371,47.928
  region: -47.683,-51.112 -47.683,47.948 -49.683,47.948 -49.683,-51.112
  rectangle: -49.657,-51.054 49.403,-49.054

## Silkscreen, mask and mechanical layers (free items; w line width, h text height)
Mechanical 1:
  the board outline again, w0.254

## Text inside footprints (layer, text, board x,y; h text height)
Q1: Top Overlay "*" at -19.19,22.681 h1.27 r90; Top 3D Body "*" at -21.526,25.596 h1.27 r90